# Altium PCB PCB1.PcbDoc
Units mm, origin at the board's own origin, x right, y up, seen from the top; angles counter-clockwise.
Board outline 32.22 x 32.95 mm, 4 copper layers (L1(SIGNAL), L2(GND), L3(GND), L4(SIGNAL)), stack 1.57 mm thick; 36 components, 28 nets, 174 pads, 87 vias.
Unrouted connection lines stored in the file: 1.
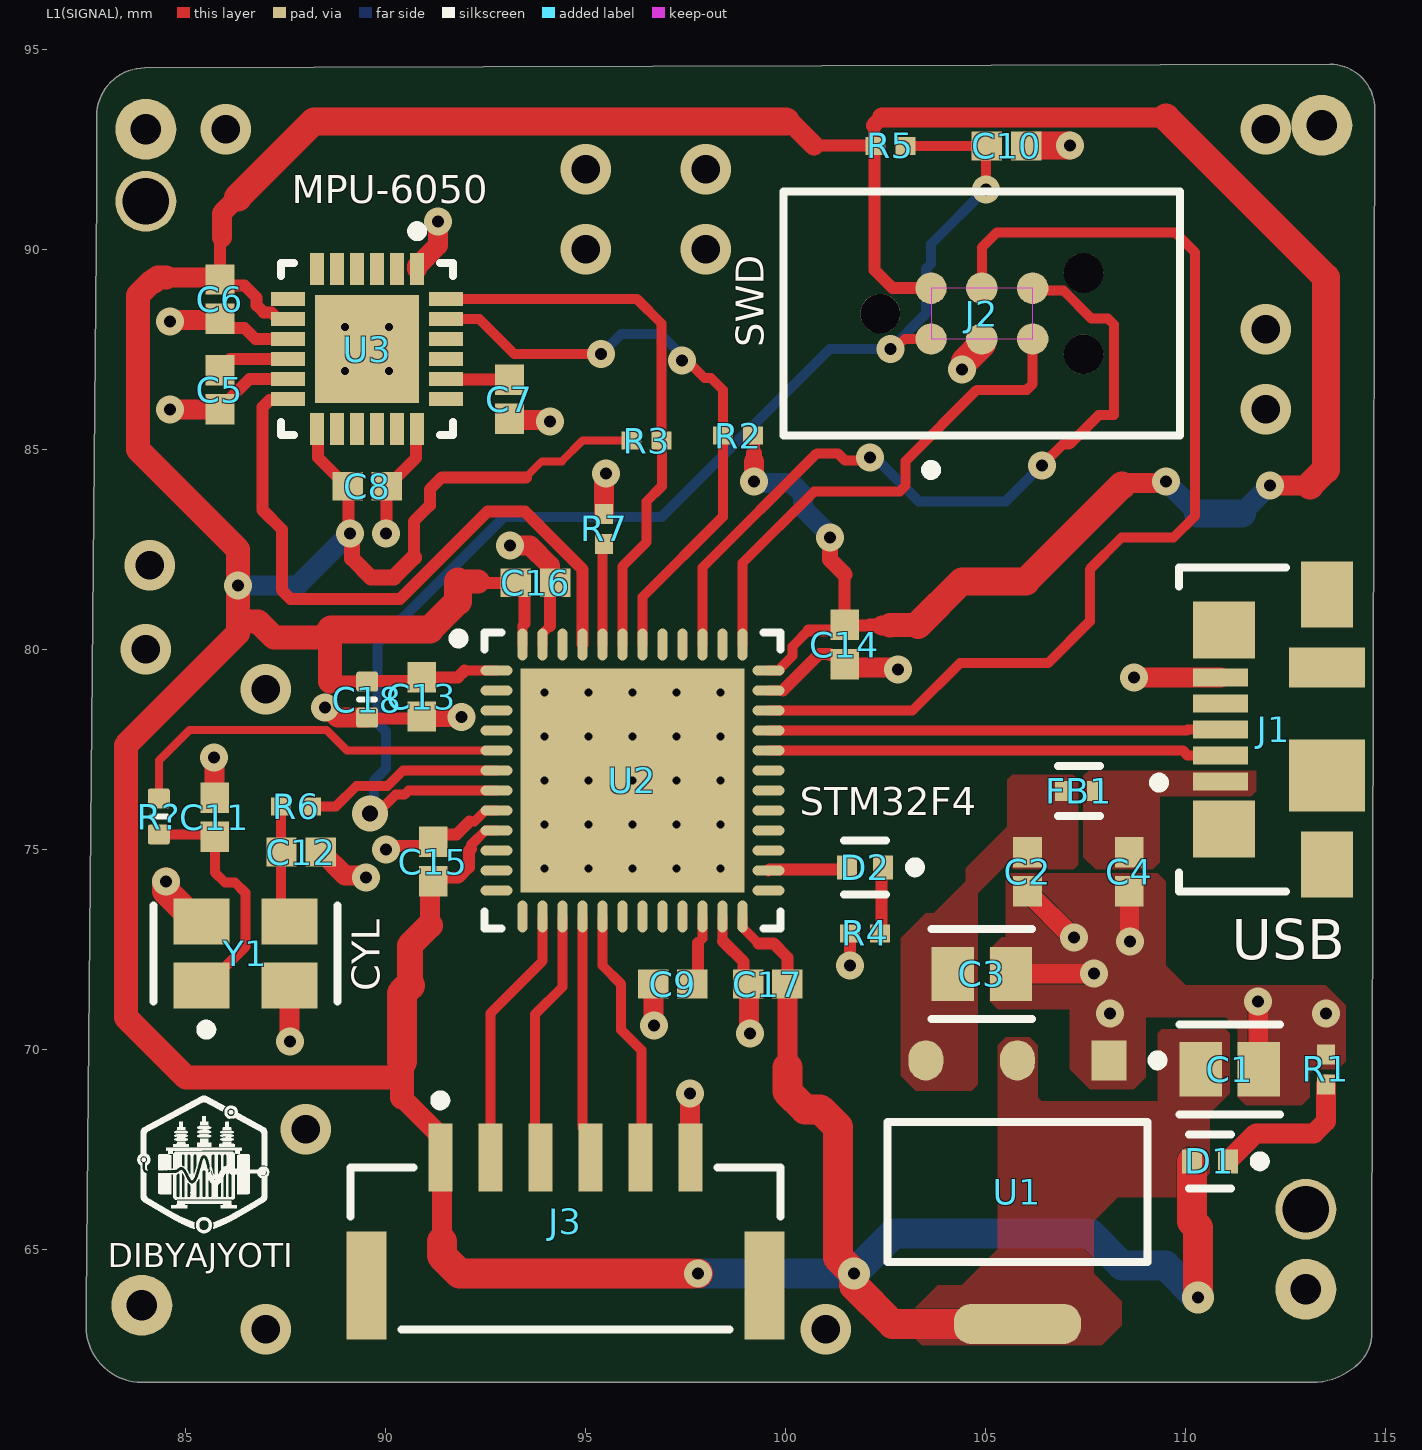
[diagram p0: L1(SIGNAL) view]
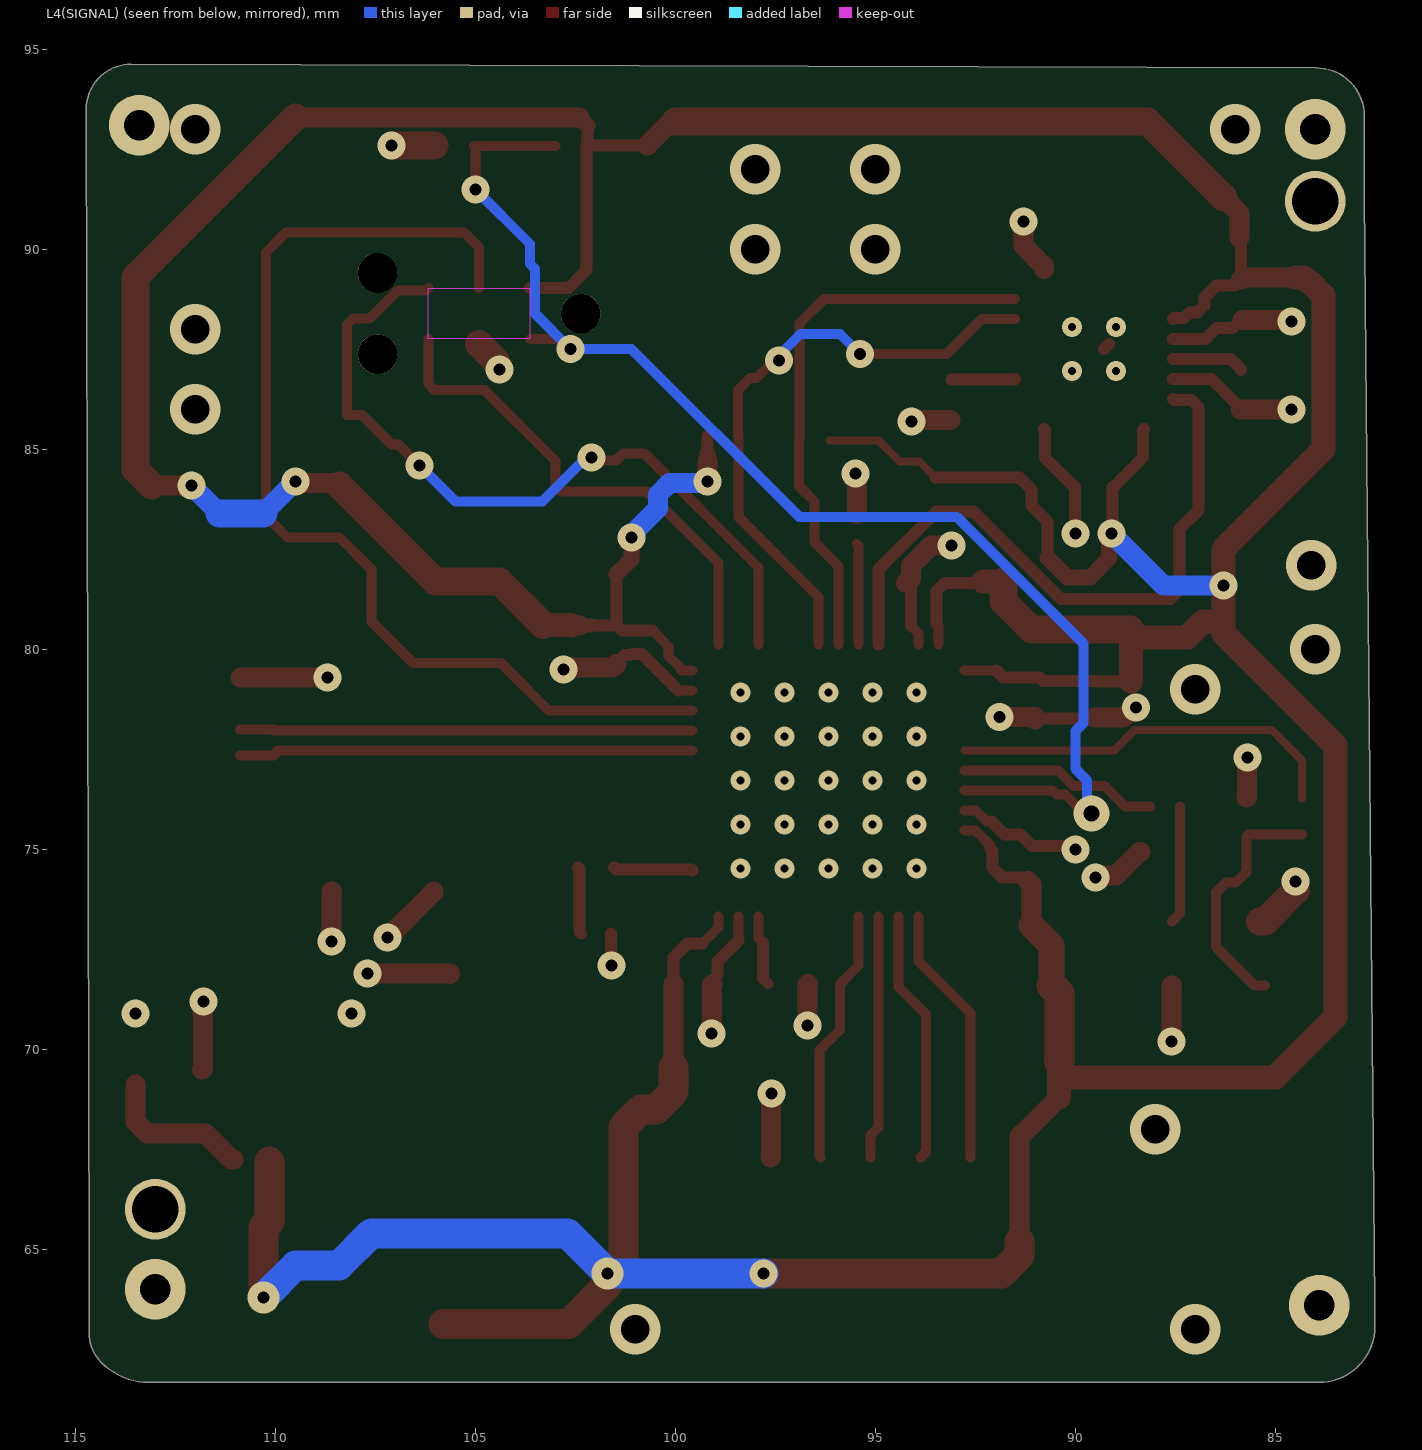
[diagram p1: L4(SIGNAL) view, seen from below]
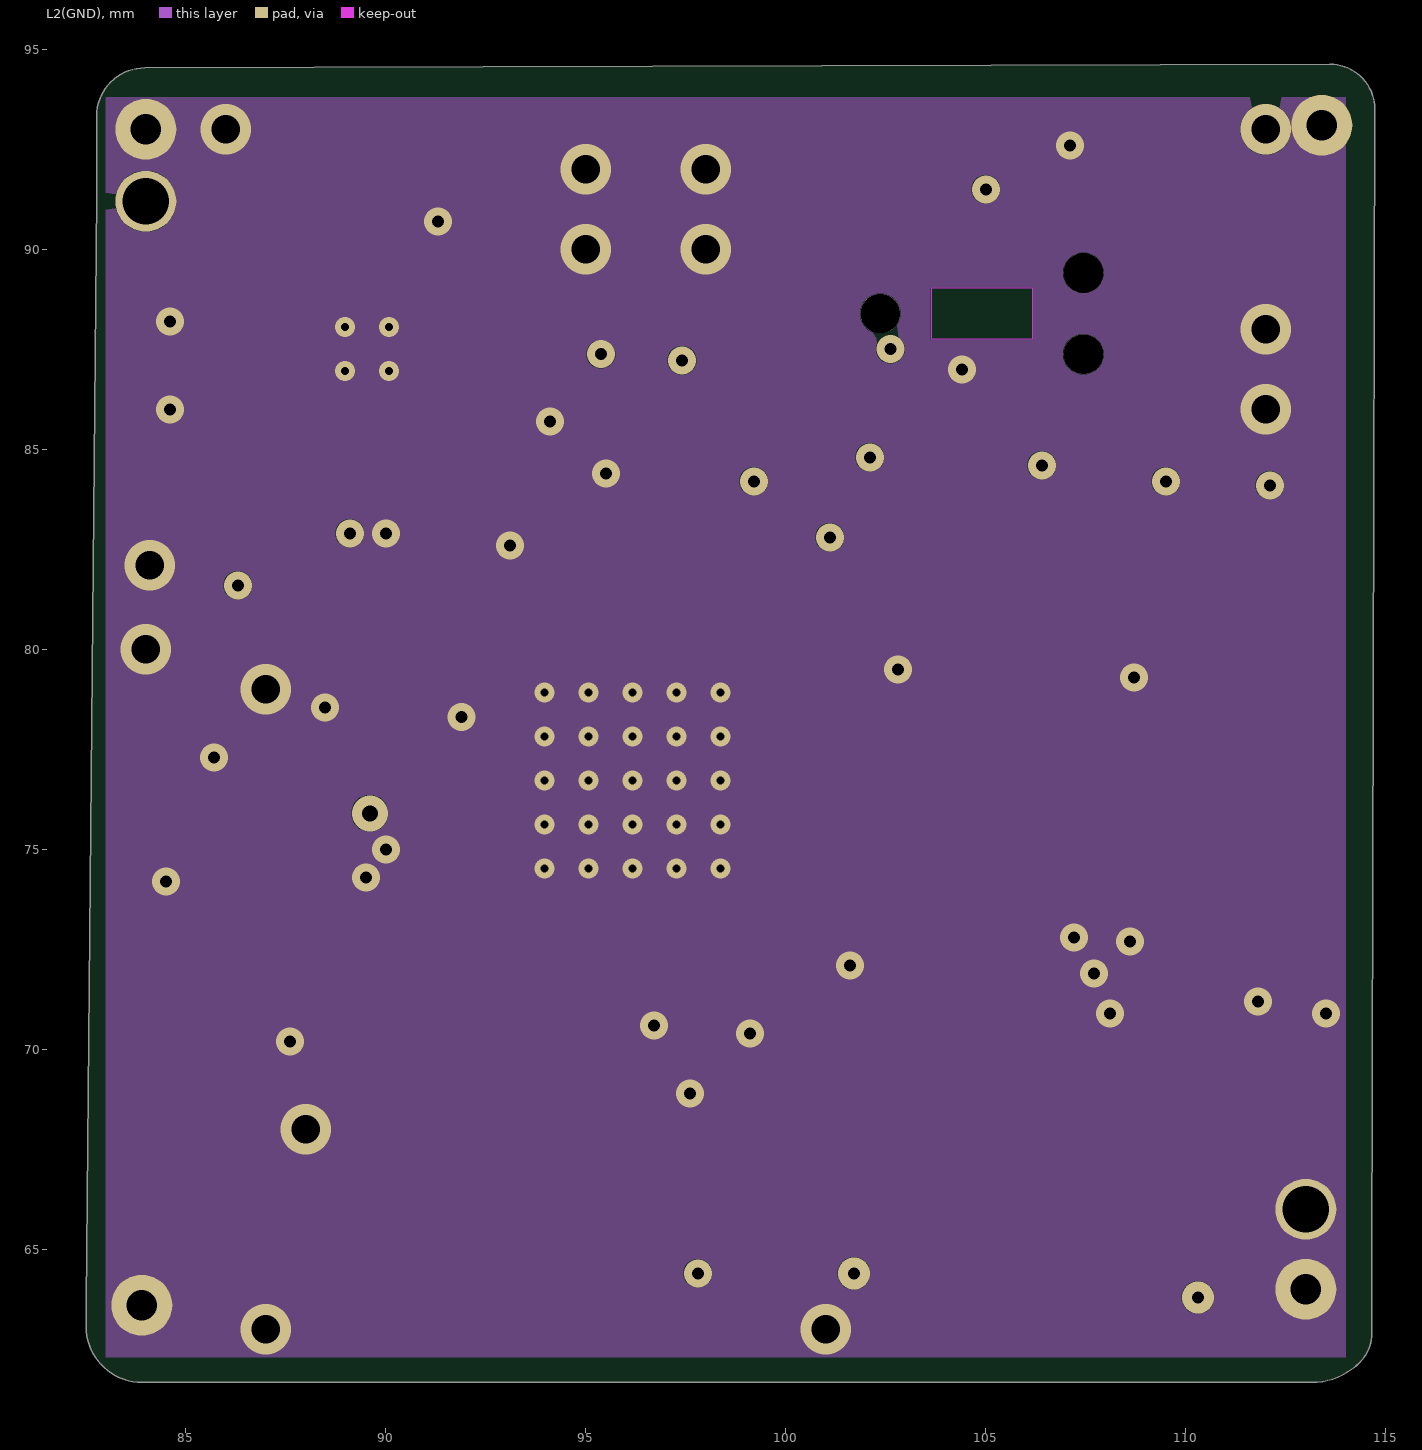
[diagram p2: L2(GND)]
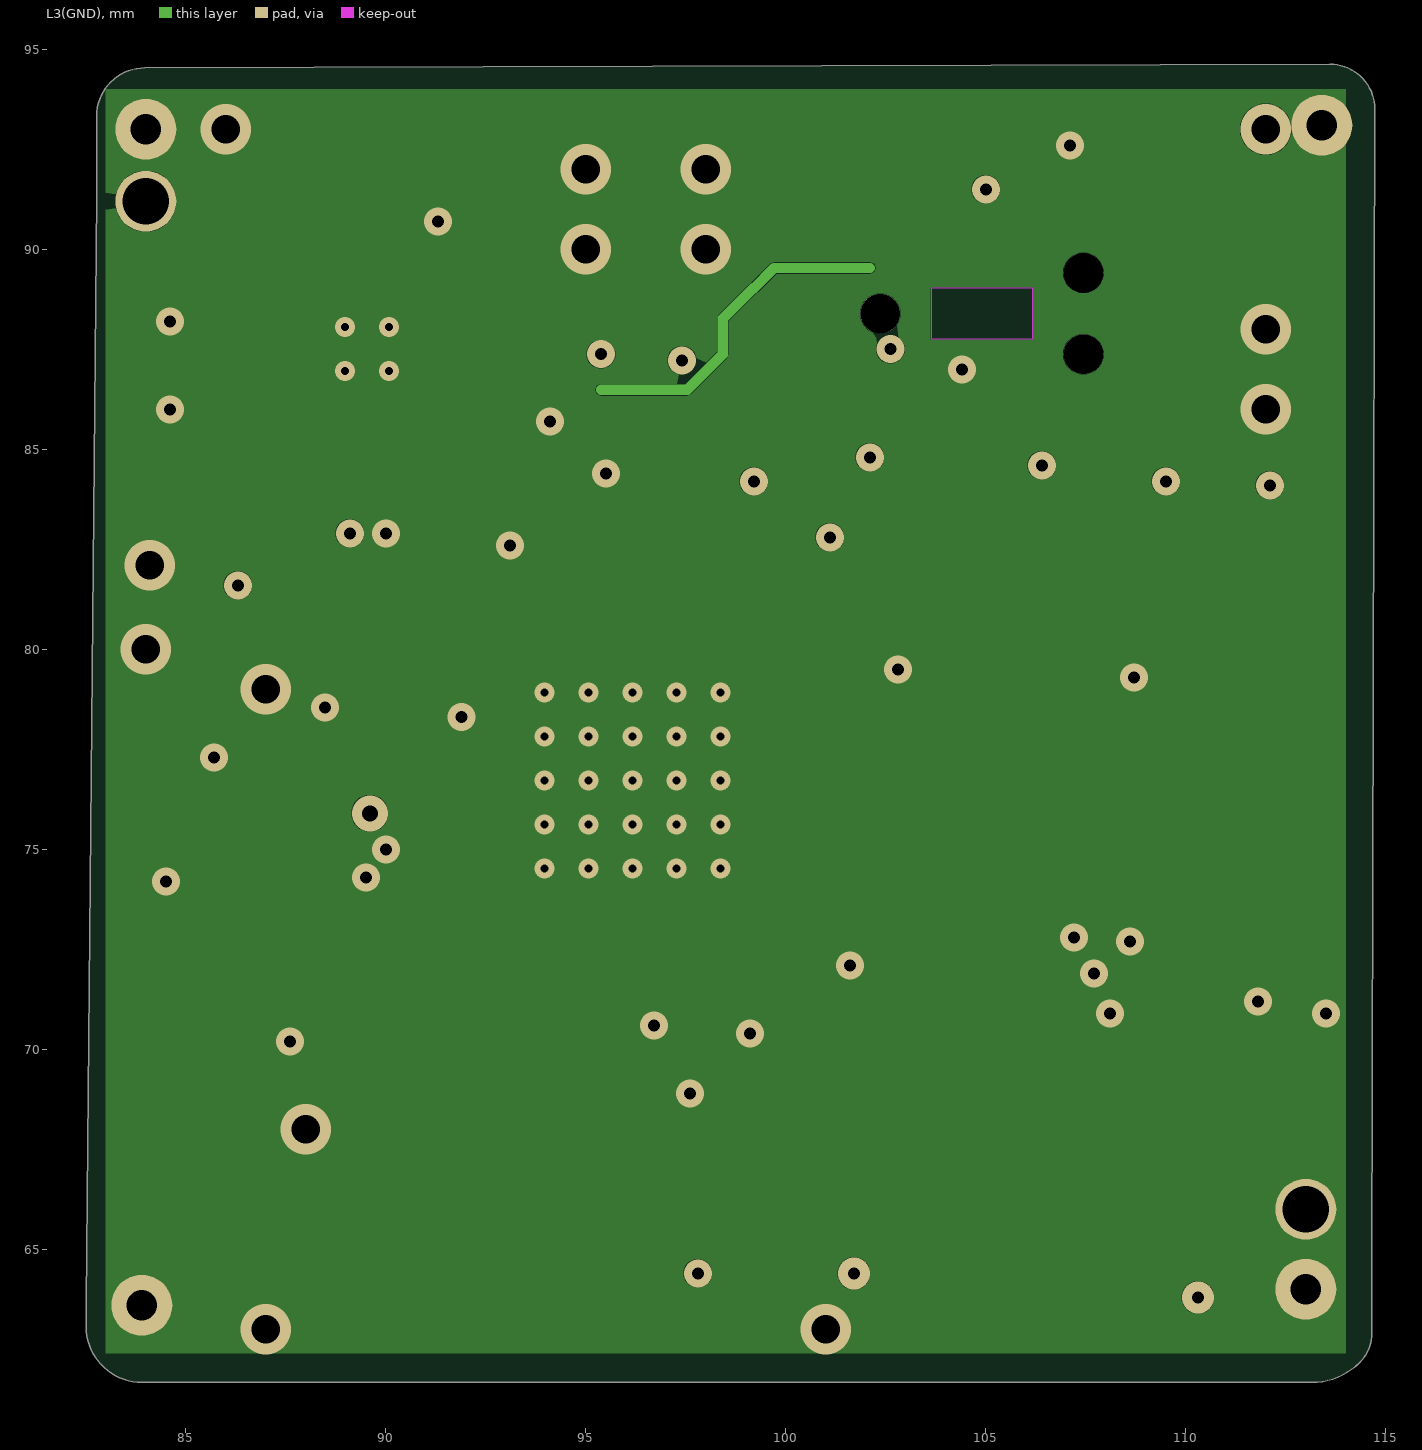
[diagram p3: L3(GND)]

## Layer stack, top to bottom
Top Solder: solder mask 0.0254, SM-001, Dk 4
L1(SIGNAL): signal copper 0.035
Dielectric 1: prepreg 0.2, PP-017, Dk 4.6
L2(GND): signal copper 0.0175
Dielectric 3: core 1.065, Core-039, Dk 4.6
L3(GND): signal copper 0.0175
Dielectric 5: prepreg 0.2, PP-017, Dk 4.6
L4(SIGNAL): signal copper 0.035
Bottom Solder: solder mask 0.0254, SM-001, Dk 4

## Board outline
82.51,63.07 82.51,63.666 82.51,63.667 82.771,91.3 82.773,91.317 82.773,93.33 cw(c83.978,93.33) 83.977,94.535 113.6,94.627 cw(c113.6,93.5) 114.727,93.5 114.649,64.5 114.649,62.894 cw(c113.623,62.894) 114.349,62.169 cw(c113.151,63.366) 113.151,61.673 112.8,61.673 85.2,61.673 83.907,61.673 cw(c83.907,63.07)

## Design rules (kind name [scope] priority, off if disabled: settings)
Clearance [All] p1: gap=0.005 ignorepadtopadclearanceinfootprint=FALSE
DiffPairsRouting [All] p1: maxlimit=0.254 minlimit=0.203 mostfreqgap=0.254 toplayer_maxgap=0.203 toplayer_prefgap=0.203 toplayer_minwidth=0.26 toplayer_maxwidth=0.26 toplayer_prefwidth=0.26 bottomlayer_maxgap=0.203 bottomlayer_prefgap=0.203 bottomlayer_minwidth=0.26 bottomlayer_maxwidth=0.26 bottomlayer_prefwidth=0.26 impedanceprofiledriven=TRUE impedanceprofileid={06808E62-EBBD-491B-83CC-CD129CA47F08} impedanceprofilevalue=90.000000 maxuncoupledlength=12.7
PolygonConnect [All] p1: connectstyle=Direct reliefconductorwidth=0.254 reliefentries=4 polygonreliefangle="90 Angle" airgapwidth=0.254
RoutingVias [All] p1: holewidth=0.3 width=0.7 viastyle="Through Hole" minholewidth=0.25 minwidth=0.55 maxholewidth=0.4 maxwidth=0.9
SolderMaskExpansion [All] p1: expansion=0 istentingtop=FALSE
SupplyNets "Schematic Supply Nets_4" [InNet('VBUS')] p1: voltage=0.000
SupplyNets "Schematic Supply Nets_3" [InNet('+3V3')] p2: voltage=0.000
SupplyNets "Schematic Supply Nets_2" [InNet('GND')] p3: voltage=0.000
SupplyNets "Schematic Supply Nets" [InNet('+5V')] p4: voltage=0.000
UnRoutedNet [All] p1: checkbadconnections=TRUE
Width [All] p1: maxlimit=1 minlimit=0.2 preferedwidth=0.3 midlayer1_minwidth=0.254 midlayer1_maxwidth=0.254 midlayer1_prefwidth=0.254 midlayer2_minwidth=0.254 midlayer2_maxwidth=0.254 midlayer2_prefwidth=0.254 minimp=50.000000 maximp=50.000000 favimp=50.000000
28 further rules are at their usual default settings.

## Classes and differential pairs
net class DIFF_USB: USB_D_N USB_D_P
differential pair USB_D: +USB_D_P -USB_D_N

## Components (designator, comment, footprint, x,y, rotation, side; value= is the part's Value field where it differs from the comment)
C1 "22u" FP-CL21-IPC_C 111.1,69.5 r0 top
C2 "100n" CAPC1050X55X23ML05T13 106.045,74.44 r90 top
C3 "22u" FP-CL21-IPC_C 104.902,71.882 r0 top
C4 "100n" CAPC1050X55X23ML05T13 108.585,74.44 r90 top
C5 "100n" CAPC1050X55X23ML05T13 85.852,86.487 r90 top
C6 "10n" CAPC1050X55X23ML05T13 85.852,88.755 r270 top
C7 "2n2" CAPC1050X55X23ML05T13 93.091,86.251 r270 top
C8 "100n" CAPC1050X55X23ML05T13 89.535,84.074 r180 top
C9 "2.2u" CAPC1050X55X23ML05T13 97.173,71.628 r0 top
C10 "100n" CAPC1050X55X23ML05T13 105.519,92.583 r180 top
C11 "100n" CAPC1050X55X23ML05T13 85.725,75.801 r270 top
C12 "100n" CAPC1050X55X23ML05T13 87.884,74.93 r180 top
C13 "100n" CAPC1050X55X23ML05T13 90.9,78.81 r90 top
C14 "100n" CAPC1050X55X23ML05T13 101.473,80.119 r90 top
C15 "100n" CAPC1050X55X23ML05T13 91.186,74.694 r270 top
C16 "100n" CAPC1050X55X23ML05T13 93.744,81.661 r180 top
C17 "100n" CAPC1050X55X23ML05T13 99.55,71.628 r0 top
C18 "Capacitor 2,2µF +/-20% 10V 0402" CAPC0402(1005)60_L 89.535,78.74 r90 top value=2.2µF
D1 "ML-P11DTT86R" FP-SML-P11-MFG 110.6,67.2 r180 top
D2 "ML-P11DTT86R" FP-SML-P11-MFG 101.981,74.549 r180 top
FB1 "120R" FP-BLM15-0_05-MFG 107.334,76.454 r180 top
J1 "473460001" FP-473460001-MFG 113.181,77.993 r90 top
J2 "TC2030-MCP-NL" FP-TC2030-MCP-NL-MFG 104.902,88.392 r0 top locked
J3 "SM06B-GHS-TB(LF)(SN)" FP-SM06B-GHS-TB_LF_SN-MFG 94.488,65.024 r0 top
R1 "1k" RESC1005X40X25LL05T10 113.5,69.5 r270 top
R2 "2K2" RESC1005X40X25LL05T10 98.806,85.344 r0 top
R3 "262" RESC1005X40X25LL05T10 96.52,85.217 r180 top
R4 "10K" RESC1005X40X25LL05T10 101.981,72.898 r0 top
R5 "10K" RESC1005X40X25LL05T10 102.616,92.583 r180 top
R6 "10K" RESC1005X40X25LL05T10 87.757,76.073 r180 top
R7 "10K" RESC1005X40X25LL05T10 95.459,83.007 r270 top
R? "Resistor 1K +/-5 % 0402 63 mW" RESC0402(1005)_L 84.328,75.819 r90 top value=1k
U1 "ams1117" FP-ams1117-IPC_C 105.791,66.428 r270 top
U2 "STM32F411CEU6" STM-UFQFPN48_L 96.168,76.72 r0 top
U3 "MPU-6050" IS-QFN-24_V 89.535,87.503 r270 top
Y1 "24MHz" FP-TSX-3225-MFG 86.487,72.39 r0 top

## Footprints (in the part's own frame and the unit in brackets; to place one, negate y for a bottom-side part, rotate by r counter-clockwise, add the part's x,y. Pads: shape width x height; smd on the part's side, far side on the other; paste and mask are expansions set on the pad)
CAPC0402(1005)60_L [mm] "Chip Capacitor, Body 1.0x0.5mm, Height 0.6mm, IPC High Density"
  rrect25% 0.5x0.55 smd: 1(-0.45,0) 2(0.45,0)
  silkscreen extent 0,-0.2 0,0.2, body extent -0.5,-0.25 0.5,0.25, height 0.6
CAPC1050X55X23ML05T13 [mm] "Chip Capacitor, 2-Leads, Body 1.05x0.55mm, IPC Low Density"
  rect 0.76x0.72 smd: 1(-0.49,0) 2(0.49,0)
  body extent -0.53,-0.28 0.53,0.27, height 0.55
FP-473460001-MFG [mm]
  rect 0.45x1.38 smd paste+0 mask+0: 1(-1.3,2.31) 2(-0.65,2.31) 3(0,2.31) 4(0.65,2.31) 5(1.3,2.31)
  rect 1.425x1.55 smd paste+0 mask+0: 6(-2.488,2.225) 7(2.488,2.225)
  rect 1.65x1.3 smd paste+0 mask+0: 8(-3.375,-0.35) 11(3.375,-0.35)
  rect 1.8x1.9 smd paste+0 mask+0: 9(-1.15,-0.35)
  rect 1x1.9 smd paste+0 mask+0: 10(1.55,-0.35)
  silkscreen extent -4.05,0.67 4.05,3.97, body extent -4.3,-2.48 4.3,3.45, height 0.25
FP-ams1117-IPC_C [mm]
  rect 1.004x0.872 smd paste+0 mask+0: 1(-3.295,2.29)
  rrect100% 1.004x0.872 smd paste+0 mask+0: 2(-3.295,0) 3(-3.295,-2.29)
  rrect87% 1.004x3.182 smd paste+0 mask+0: 4(3.295,0)
  silkscreen extent -3.42,-3.25 1.75,3.63, body extent -3.9,-3.35 3.9,3.35, height 0.25
FP-BLM15-0_05-MFG [mm]
  rect 0.4x0.5 smd paste+0 mask+0: 1(-0.4,0) 2(0.4,0)
  silkscreen extent -0.53,-0.63 0.52,0.63, body extent -0.7,-0.38 0.7,0.38, height 0.25
FP-CL21-IPC_C [mm]
  rect 1.055x1.356 smd paste+0 mask+0: 1(-0.726,0) 2(0.726,0)
  silkscreen extent -1.25,-1.12 1.25,1.12, body extent -1.35,-0.82 1.35,0.82, height 0.25
FP-SM06B-GHS-TB_LF_SN-MFG [mm]
  rect 0.6x1.7 smd paste+0 mask+0: 1(-3.125,2.275) 2(-1.875,2.275) 3(-0.625,2.275) 4(0.625,2.275) 5(1.875,2.275) 6(3.125,2.275)
  rect 1x2.7 smd paste+0 mask+0: 7(-4.975,-0.925) 8(4.975,-0.925)
  silkscreen extent -5.38,-2.02 5.38,3.82, body extent -5.58,-2.37 5.58,3.22, height 0.25
FP-SML-P11-MFG [mm]
  rect 0.5x0.6 smd paste+0 mask+0: 1(-0.45,0) 2(0.45,0)
  silkscreen extent -1.38,-0.67 0.53,0.67, body extent -0.8,-0.43 0.8,0.43, height 0.25
FP-TC2030-MCP-NL-MFG [mil]
  round 30.98 smd paste-39370.1 mask+0: 1(-50,-25) 2(-50,25) 3(0,-25) 4(0,25) 5(50,-25) 6(50,25)
  round 39.02 hole 39.02 unplated paste-99999 mask+0: ""(-100,0) ""(100,-40) ""(100,40)
  Keep-Out Layer region: -50,-25 50,-25 50,25 -50,25
  silkscreen extent -195,-159 195,120, body extent -199,-124 199,124, height 10
FP-TSX-3225-MFG [mm]
  rect 1.4x1.15 smd paste+0 mask+0: 1(-1.1,-0.8) 2(1.1,-0.8) 3(1.1,0.8) 4(-1.1,0.8)
  silkscreen extent -2.3,-2.02 2.3,1.2, body extent -1.9,-1.48 1.9,1.48, height 0.25
IS-QFN-24_V [mm] "QFN, 24-Leads, Body 4x4mm, Pitch 0.5mm, Thermal Pad 2.7x2.6mm"
  rect 0.8x0.35 smd: 1(-2,1.25) 2(-2,0.75) 3(-2,0.25) 4(-2,-0.25) 5(-2,-0.75) 6(-2,-1.25) 13(2,-1.25) 14(2,-0.75) 15(2,-0.25) 16(2,0.25) 17(2,0.75) 18(2,1.25)
  rect 0.35x0.85 smd mask+0.102: 7(-1.25,-1.975) 8(-0.75,-1.975) 9(-0.25,-1.975) 10(0.25,-1.975) 11(0.75,-1.975) 12(1.25,-1.975) 19(1.25,1.975) 20(0.75,1.975) 21(0.25,1.975) 22(-0.25,1.975) 23(-0.75,1.975) 24(-1.25,1.975)
  rect 2.7x2.6 smd: 25(0,0)
  silkscreen extent -3.07,-2.15 2.15,2.15, body extent -2,-2 2,2, height 0.95
RESC0402(1005)_L [mm] "Chip Resistor, Body 1.0x0.5mm, IPC High Density"
  rrect25% 0.5x0.55 smd: 1(-0.45,0) 2(0.45,0)
  silkscreen extent 0,-0.2 0,0.2, body extent -0.5,-0.25 0.5,0.25, height 0.3
RESC1005X40X25LL05T10 [mm] "Chip Resistor, 2-Leads, Body 1.00x0.50mm, IPC High Density"
  rect 0.5x0.45 smd: 1(-0.375,0) 2(0.375,0)
  body extent -0.53,-0.27 0.53,0.28, height 0.4
STM-UFQFPN48_L [mm] "QFN, 48-Leads, Body 7.1x7.1mm, Pitch 0.5mm, Thermal Pad 5.6x5.6mm, IPC High Density"
  oval 0.8x0.25 smd: 1(-3.4,2.75) 2(-3.4,2.25) 3(-3.4,1.75) 4(-3.4,1.25) 5(-3.4,0.75) 6(-3.4,0.25) 7(-3.4,-0.25) 8(-3.4,-0.75) 9(-3.4,-1.25) 10(-3.4,-1.75) 11(-3.4,-2.25) 12(-3.4,-2.75) 25(3.4,-2.75) 26(3.4,-2.25) 27(3.4,-1.75) 28(3.4,-1.25) 29(3.4,-0.75) 30(3.4,-0.25) 31(3.4,0.25) 32(3.4,0.75) 33(3.4,1.25) 34(3.4,1.75) 35(3.4,2.25) 36(3.4,2.75)
  oval 0.25x0.8 smd: 13(-2.75,-3.4) 14(-2.25,-3.4) 15(-1.75,-3.4) 16(-1.25,-3.4) 17(-0.75,-3.4) 18(-0.25,-3.4) 19(0.25,-3.4) 20(0.75,-3.4) 21(1.25,-3.4) 22(1.75,-3.4) 23(2.25,-3.4) 24(2.75,-3.4) 37(2.75,3.4) 38(2.25,3.4) 39(1.75,3.4) 40(1.25,3.4) 41(0.75,3.4) 42(0.25,3.4) 43(-0.25,3.4) 44(-0.75,3.4) 45(-1.25,3.4) 46(-1.75,3.4) 47(-2.25,3.4) 48(-2.75,3.4)
  rect 5.6x5.6 smd: 49(0,0)
  silkscreen extent -4.47,-3.7 3.7,3.7, body extent -3.55,-3.55 3.55,3.55, height 0.6

## Part data
C1 C3: library part CMP-2000-05017-2, "CL21 Series 0805 100nF 50V ±10% Tolerance X7R Multilayer Ceramic Chip Capacitor", Capacitance=100nF, Case Code (Imperial)=0805, Case Code (Metric)=2012, Dielectric=X7R, Max Operating Temperature=125°C, Min Operating Temperature=-55°C, Tolerance=10%, Voltage=50V, Case/Package=0805, Contact Plating=Tin, Depth=1.25mm, Height=0.85mm, Lead Free="Lead Free", Length=2mm, Material=Ceramic, Mount="Surface Mount", Packaging="Tape and Reel", Radiation Hardening=No, Thickness=0.037inch, Voltage Rating=50V, Voltage Rating (DC)=50V, Width=0.049inch
C2 C4 C5 C6 C7 C8 C9 C10 C11 C12 C13 C14 C15 C16 C17: library part CMP-2000-05439-1, "Chip Capacitor, 100 nF, +/- 10%, 16 V, -55 to 125 degC, 0402 (1005 Metric), RoHS, Tape and Reel", Capacitance=100000pF, Case Size/Dimension=0402, Dielectric=X7R, Manufacturer="Samsung Electro-Mechanics", Rated Voltage=16V, Tolerance (%)=±10%, Datasheet URL=https://datasheet.ciiva.com/29198/458718-da-01-en-vs-kondensator-0402-29198423.pdf, Datasheet Version=Nov-10, Manufacturer URL=http://www.samsungsem.com/global/index.jsp
C18: library part CMP-001-00056-4, "Chip Capacitor, 2,2µF +/-20%, 10V, 0402, Thickness 0.6 mm", Case/Package=0402, Max Operating Temperature=85°C, Min Operating Temperature=-55°C, Tolerance=10%, Voltage Rating=10V, Mounting Technology=SMT, Pins=2
D1 D2: library part CMP-08952-000022-1, "LED ORANGE CLEAR 1006 SMD", Colour=Orange, Forward Current=1mA, Forward Voltage=1.9V, Manufacturer=Rohm, Manufacturer Part Number=SML-P11DTT86R, Package=SML-P11, Power Dissipation=52mW, Reverse Voltage=5V, Temperature="-40°C to +85°C", Temperature Range High=+85°C, Temperature Range Low=-40°C, Automotive=No, Category=Diode, ComponentLink2Description=Datasheet, ComponentLink2URL=https://d1d2qsbl8m0m72.cloudfront.net/en/products/databook/datasheet/opto/led/chip_mono/sml-p11-e.pdf, Device Class L1=Optoelectronics, Device Class L2=LEDs, Device Class L3=unset, Digikey Description="LED ORANGE CLEAR 1006 SMD", Height=0.25mm, Lead Free=Yes, Led Orientation="Top View", Luminous Intensity=7.3mcd, Mouser Description="LED Uni-Color Orange 2-Pin Chip 0402(1006Metric) T/R", Octopart=https://octopart.com/sml-p11dtt86r-rohm-34112313, RoHS=TRUE, Wavelength=605nm
FB1: library part CMP-0686-00187-4, "Chip Ferrite Bead, 0402, 600Ω @ 100MHz, 0.52Ω, 25%, 300mA", Case Code (Imperial)=0402, Case Code (Metric)=1005, Current Rating=300mA, DC Resistance (DCR)=520mR, DC Resistance-Max=600mR, Frequency=100MHz, Max Operating Temperature=125°C, Min Operating Temperature=-55°C, Package Quantity=10000, Tolerance=25%, Case/Package=0402, Core Material=Ferrite, DC Current=300mA, Depth=0.55mm, Height=0.5mm, Impedance=600R, Lead Free="Lead Free", Length=1mm, Material=Steel, Max Current Rating=300mA, Max DC Current=300mA, Military Standard=Not, Number of Circuits=1, Number of Lines=1, Number of Pins=2, Packaging="Tape and Reel", Radiation Hardening=No, REACH SVHC="No SVHC", RoHS Compliant=Yes, Series=BLM15AG_SN, Shielding=Unshielded, Termination=SMD/SMT, Test Frequency=100MHz, Width=0.5mm
J1: library part CMP-2000-05246-2, "CONN RCPT USB2.0 MICRO B SMD R/A", Current Rating=1.8A, Manufacturer=Molex, Package=0, Temperature="-30°C to +85°C", Temperature Range High=+85°C, Temperature Range Low=-30°C, Voltage Rating=30V, Automotive=No, Category=Conn, ComponentLink2Description=Datasheet, ComponentLink2URL=https://www.molex.com/webdocs/datasheets/pdf/en-us/0473460001_IO_CONNECTORS.pdf, Conn Orientation="Right Angle", Contact Material=Gold,Nickel, Device Class L1=Connectors, Device Class L2="USB Connectors", Device Class L3=unset, Digikey Description="CONN RCPT USB2.0 MICRO B SMD R/A", Footprint Url=https://www.molex.com/pdm_docs/sd/473460001_sd.pdf, Height=2.945mm, Is Female=yes, Lead Free=Yes, Manufacturer Part Number=473460001, Number Of Contacts=5, Octopart=https://octopart.com/47346-0001-molex-7164928, Pitch=0.65mm, RoHS=TRUE, Shielding=true, Usb Standard="USB 2.0"
J2: library part CMP-205963-000002-1, "CABLE TAG-CONNECT IN-CIRCUIT", Package Quantity=1, Lead Free="Lead Free", Reach SVHC Compliant=Yes, RoHS Compliant=Yes, Series=-
J3: library part CMP-17439-000061-1, "CONN HEADER SMD R/A 6POS 1.25MM", Color=Natural, Contact Resistance=50mR, Current Rating=1A, Housing Color=Beige, Max Operating Temperature=85°C, Max Voltage Rating (AC)=50V, Min Operating Temperature=-25°C, Connector Type="Outer Shroud Contact", Contact Material=Bronze, Contact Plating=Tin, Depth=4.05mm, Fastening Type=Ramp, Housing Material=Polyamide, Lead Free="Lead Free", Length=10.75mm, Max Current Rating=1A, Mount="Surface Mount", Number Of Contacts=6, Number of Positions=6, Number of Rows=1, Orientation="Right Angle", Packaging="Tape and Reel", Pitch=1.25mm, Termination=Solder, Voltage Rating=50V
R1 R2 R3 R4 R5 R6 R7: library part CMP-2002-07353-1, Manufacturer="Yageo / Phycomp", Part Number=RC0402FR-0710KL
R?: library part CMP-009-00157-3, "Chip Resistor, 1 kOhms, +/-5 %, 63 mW, -55 to 155 degC, 0402", Case/Package=0402, Max Operating Temperature=155°C, Min Operating Temperature=-55°C, Power=63mW, Tolerance=5%, Pins=2
U1: library part CMP-209535-000002-1, "1A LOW DROPOUT VOLTAGE REGULATOR", RoHS Compliant=Yes
U2: library part CMP-0243-00165-1, "ARM Cortex-M4 32-bit MCU+FPU, 512 KB Flash, 128 KB RAM, 36 I/Os, 48-Pin UFQFPN, -40 to 85 degC, Tray", I/Os (High Current)=36, Operating Frequency(F) (Processor speed) (MHz)=100, Package Description=UFQFPN48, Package Reference="48-Pin Ultra Thin Fine Pitch Quad Flat No-Lead, 7 x 7 x 0.6 mm Body, 0.5 mm Pitch, Exposed Pad", Supply Voltage(Vcc) min (V)=1.7, ComponentLink1Description="Manufacturer URL", ComponentLink1URL=http://www.st.com/, ComponentLink2Description=Datasheet, ComponentLink2URL=http://www.st.com/st-web-ui/static/active/en/resource/technical/document/datasheet/DM00115249.pdf, Core="ARM Cortex-M4", DatasheetVersion="Rev. 6", FLASH Size (Prog) (kB)=512, Internal RAM Size (kB)=128, Mounting Technology="Surface Mount", Packing=Tray
U3: library part CMP-1753-00002-2, "3-Axis Gyroscope, Accelerometer and a Digital Motion Processor(TM) (DMP), 2.375 to 3.46 V, -40 to 85 degC, 24-Pin QFN, RoHS, Tape and Reel", Manufacturer=InvenSense, Standard Package=5,000, Category=Sensors,Transducers, Datasheet URL=http://datasheet.octopart.com/MPU-6050-InvenSense-datasheet-14421344.pdf, Datasheet Version="Rev. 3.3, 05/2012", Dynamic Catalog=MPU-6000™Series, Family=Multifunction, Featured Product=MPU-60506-Axis,IntegratedI²CSolution, Manufacturer URL=http://www.invensense.com/, Online Catalog=MPU-6000™Series, Other Names="1428-1007-2 / MPU6050", Output Type=Digital, Sensor Type=MotionTracking, Unit PriceUSD=Digital
Y1: library part CMP-36405-000018-1, "CRYSTAL 24.0000MHZ 9PF SMD", Case/Package=SMD/SMT, ESR (Equivalent Series Resistance)=40R, Frequency Stability=20ppm, Frequency Tolerance=10ppm, Load Capacitance=9pF, Max Operating Temperature=105°C, Min Operating Temperature=-40°C, Package Quantity=250, Depth=2.5mm, Drive Level=200uW, Frequency=24MHz, Height=0.024inch, Lead Free="Lead Free", Length=3.2mm, Mount="Surface Mount", Number of Pins=4, Packaging="Tape and Reel", RoHS Compliant=Yes, Series=TSX-3225, Termination=SMD/SMT, Tolerance=10ppm, Weight=0.000564oz, Width=2.5mm

## Free pads (board coordinates)
  round 1.524 hole 0.762: 7(113.4,93.1) 8(113,64) 9(83.9,63.6) 10(84,93)
  round 1.524 hole 1.152: TH(84,91.2) TH(113,66)

## Via types
v1: diameter 0.7, hole 0.3, L1(SIGNAL) to L4(SIGNAL), 41 vias
v2: diameter 0.5, hole 0.2, L1(SIGNAL) to L4(SIGNAL), 29 vias
v3: diameter 1.27, hole 0.711, L1(SIGNAL) to L4(SIGNAL), 14 vias
v4: diameter 0.8, hole 0.3, L1(SIGNAL) to L4(SIGNAL), 2 vias
v5: diameter 0.9, hole 0.4, L1(SIGNAL) to L4(SIGNAL), 1 vias

## Nets (pads, with @x,y where several pads share a name; then routed paths per layer and width w, separated by ;. In a path a pad name is that pad's centre, name@x,y a point inside that pad or via, vN(x,y) a via of type N, cw(c..) or ccw(c..) an arc to the next point about the centre after c; other vN are vias at no path point)
IMU_CPOUT: C7.1 U3.20 | length 1.6
  L1(SIGNAL) w0.3: U3.20 91.516,86.747 93.085,86.747 C7.1
+3V3: C1.1 C6.1 C8.2 C13.2 C14.2 C15.2 C16.2 C17.2 C18.2 D1.2 J2.2 J3.1 R2.2 R3.2 R5.2 U1.2 U1.4 U2.1 U2.9 U2.24 U2.36 U2.48 U3.8 U3.13 | length 189.1
  L1(SIGNAL) w0.2: 93.5,84.3 93.9,84.7 94.4,84.7 94.917,85.217 R3.2
  L1(SIGNAL) w0.25: 91.97,79.47 U2.1 ; 92.125,75.007 92.125,75.102 92.493,75.47 U2.9 ; U2.48 93.418,80.591 93.472,80.645 ; U2.24 98.918,73.045 99.319,72.644 ; U2.36 99.843,79.47 99.843,79.504 100.169,79.83 100.169,80.071 100.564,80.466
  L1(SIGNAL) w0.3: 85.9,90.3 85.852,90.252 C6.1 86.007,89.09 86.473,89.09 86.772,88.791 86.772,88.599 86.948,88.423 87.14,88.423 87.285,88.278 87.535,88.278 U3.8 ; U3.13 88.31,85.478 88.31,84.789 89.025,84.074 C8.2 89.072,84.046 89.072,82.927 v1(89.1,82.9) ; 88.61,79.19 C18.2 89.555,79.21 90.81,79.21 C13.2 91.8,79.3 91.97,79.47 ; 90.7,82.3 90.7,83.2 91.1,83.6 91.1,84 91.4,84.3 93.5,84.3 ; C15.2 91.277,74.295 91.821,74.295 92.075,74.549 92.075,74.958 92.125,75.007 ; 92.3,81.7 92.339,81.661 C16.2 ; C16.2@93.262,81.661 93.472,81.451 93.472,80.645 ; R2.2 99.2,85.325 99.2,84.9 ; 99.319,72.644 99.695,72.644 100.04,72.299 C17.2 ; 100.564,80.466 101.33,80.466 C14.2 ; 100.7,92.6 R5.2@102.224,92.6 ; 101.473,81.873 C14.2 ; 102.1,80.6 101.482,80.6 C14.2 ; 102.2,93.1 102.2,92.624 R5.2@102.224,92.6 ; J2.2 102.673,89.027 102.224,89.476 R5.2@102.224,92.6
  L1(SIGNAL) w0.35: 102.1,80.6 102.3,80.6
  L1(SIGNAL) w0.4: v1(89.1,82.9) 89.157,82.843 89.157,82.269 89.626,81.8 90.2,81.8 90.7,82.3 ; 99.2,84.7 99.2,84.9 ; v1(101.1,82.8) 101.1,82.246 101.473,81.873 ; 102.2,93.1 102.4,93.3 ; 102.3,80.6 102.4,80.6
  L1(SIGNAL) w0.5: 84.5,89.3 85.797,89.3 C6.1 ; 85.9,90.3 85.9,90.9 86.3,91.3 ; 90.401,68.799 91.301,67.899 91.313,67.899 91.4,67.812 91.4,65.2 ; 91.1,73.1 91.1,74.118 C15.2 ; v1(99.2,84.2) 99.2,84.7 ; 100,93.2 100.1,93.2 100.7,92.6 ; 100.04,69.54 C17.2 ; 102.4,80.6 102.6,80.6 ; 102.4,93.3 109.5,93.3 ; 108.4,84.1 108.462,84.162 109.462,84.162 v1(109.5,84.2) ; v1(112.1,84.1) 113.1,84.1
  L1(SIGNAL) w0.6: 84.5,89.3 84.3,89.3 84.2,89.2 84.151,89.2 83.8,88.849 83.8,85 86.3,82.5 v1(86.3,81.6) 86.3,80.7 ; 88.61,79.19 88.61,80.5 88.41,80.3 87.2,80.3 86.8,80.7 86.3,80.7 ; 90.401,68.799 90.401,69.3 ; 90.401,69.699 90.401,69.3 ; 91.8,81.7 92.3,81.7 ; 102.6,80.6 102.609,80.609 103.309,80.609 ; 86.3,80.7 86.3,80.4 83.5,77.6 83.5,70.8 85,69.3 90.401,69.3
  L1(SIGNAL) w0.65: 90.6,71.6 90.6,72.6 91.1,73.1
  L1(SIGNAL) w0.7: 86.3,91.3 88.2,93.2 99,93.2 100,93.2 ; 88.627,80.5 91.1,80.5 91.8,81.2 91.8,81.7 ; 103.309,80.609 104.4,81.7 106,81.7 108.4,84.1 ; 109.5,93.3 113.5,89.3 113.5,84.5 113.1,84.1
  L1(SIGNAL) w0.75: 90.4,69.7 90.4,71.4 90.6,71.6 ; 91.4,65.2 91.4,64.839 91.839,64.4 v1(97.8,64.4) ; 100.04,69.54 100.04,68.939 100.479,68.5 100.861,68.5 101.3,68.061 101.3,64.8 101.71,64.39 101.71,64.09 102.667,63.133 U1.4 ; D1.2 110.15,65.7 110.3,65.55 v4(110.3,63.8)
  L3(GND) w0.254: 95.377,86.487 97.536,86.487 98.425,87.376 98.425,88.265 99.187,89.027 99.205,89.027 99.713,89.535 102.108,89.535
  L4(SIGNAL) w0.5: v1(86.3,81.6) 87.8,81.6 v1(89.1,82.9) ; v1(99.2,84.2) 99.238,84.162 100.138,84.162 100.431,83.869 100.431,83.523 101.1,82.854 v1(101.1,82.8) ; v1(109.5,84.2) 110.3,83.4 ; 111.4,83.4 v1(112.1,84.1)
  L4(SIGNAL) w0.7: 110.3,83.4 111.4,83.4
  L4(SIGNAL) w0.75: v1(97.8,64.4) v4(101.7,64.4) 102.7,65.4 107.6,65.4 108.406,64.594 109.493,64.594 110.286,63.8 v4(110.3,63.8)
+5V: C2.2 C3.1 FB1.2 U1.3
GND: C1.2 C2.1 C3.2 C4.1 C5.1 C6.2 C7.2 C8.1 C9.1 C10.1 C11.1 C12.1 C13.1 C14.1 C15.1 C16.1 C17.1 C18.1 J1.5 J2.3 J3.6 pad.7 pad.8 pad.9 pad.10 pad.TH@113,66 R1.1 R4.1 R7.1 U1.1 U2.8 U2.23 U2.35 U2.47 U2.49 U3.1 U3.9 U3.11 U3.18 U3.25 Y1.2 Y1.4 | length 49.5
  L1(SIGNAL) w0.25: 92.09,75.692 92.215,75.692 92.493,75.97 U2.8 ; U2.47 93.918,80.395 94.107,80.584 ; U2.23 98.418,72.715 98.425,72.707 ; U2.35 U2.35@99.925,78.97
  L1(SIGNAL) w0.3: v1(84.6,86) v1@84.602,85.998 ; v1(84.6,88.2) v1@84.633,88.232 ; C6.2@85.819,88.232 C6.2 ; C5.1@85.851,85.998 C5.1 ; C5.1@85.852,86.017 86.588,86.753 U3.11 ; C6.2@85.852,88.245 86.062,88.035 86.463,88.035 86.615,87.883 86.745,87.753 U3.9 ; U3.25@89.154,87.63 U3.25@89.281,87.503 ; C18.1 89.555,78.27 91.01,78.27 C13.1@91.039,78.27 ; v1(90,75) 90.077,75.077 91.079,75.077 91.376,75.374 91.772,75.374 92.09,75.692 ; v1(90,82.9) 90.012,82.912 90.012,84.062 C8.1 ; C8.1@90.045,84.074 90.76,84.789 90.76,85.478 U3.18 ; C7.2 C7.2@93.122,85.73 ; v1@94.069,85.73 v1(94.1,85.7) ; 94.107,80.584 94.107,81.534 C16.1 ; v1@95.459,84.359 v1(95.5,84.4) ; 98.425,72.707 98.949,72.184 C17.1@98.949,71.882 ; U2.35@99.925,78.97 100.838,79.883 101.087,79.883 101.111,79.859 101.263,79.859 101.473,79.649 C14.1 ; v1(101.6,72.1) 101.603,72.103 101.603,72.895 R4.1 ; v1(104.4,87) 104.477,87.077 v1@104.477,87.2 ; J2.3@104.91,87.633 J2.3@104.91,87.757 ; C10.1 C10.1@106.017,92.591 ; v1@107.091,92.591 v1(107.1,92.6)
  L1(SIGNAL) w0.5: v1@84.602,85.998 C5.1@85.851,85.998 ; v1@84.633,88.232 C6.2@85.819,88.232 ; v1(85.7,77.3) 85.713,77.287 85.713,76.303 C11.1 ; Y1.2 87.594,71.583 87.594,70.206 v1(87.6,70.2) ; C12.1 88.394,74.93 88.986,74.338 89.462,74.338 v1(89.5,74.3) ; v1(88.485,78.547) 88.539,78.547 88.796,78.29 C18.1 ; U3.1 90.785,89.578 91.3,90.093 v1(91.3,90.7) ; C13.1@91.01,78.25 91.01,78.27 91.01,78.31 v1(91.89,78.31) ; v1(93.1,82.6) 93.6,82.6 94.104,82.096 94.104,81.771 94.214,81.661 C16.1 ; C7.2@93.122,85.73 v1@94.069,85.73 ; R7.1 v1@95.459,84.359 ; C9.1 96.692,71.619 96.692,70.608 v1(96.7,70.6) ; v1(97.6,68.9) 97.607,68.893 97.607,67.305 J3.6 ; C17.1 99.08,71.608 99.08,70.42 v1(99.1,70.4) ; C14.1 101.564,79.538 102.762,79.538 v1(102.8,79.5) ; C3.2 105.637,71.891 107.691,71.891 v1(107.7,71.9) ; C2.1 106.045,73.93 107.175,72.8 v1(107.2,72.8) ; v1@108.081,70.881 v1(108.1,70.9) ; C4.1 108.593,73.942 108.593,72.707 v1(108.6,72.7) ; v1(108.7,79.3) 108.704,79.296 110.868,79.296 J1.5 ; v1(111.8,71.2) 111.813,71.187 111.813,69.513 C1.2
  L1(SIGNAL) w0.7: v1(84.5,74.2) 84.5,73.952 85.262,73.19 Y1.4 ; v1@104.477,87.2 J2.3@104.91,87.633 ; C10.1@106.017,92.591 v1@107.091,92.591
  other v1: 113.5,70.9
  other v2: 93.968,74.52 95.068,74.52 96.168,74.52 97.268,74.52 98.368,74.52 93.968,75.62 95.068,75.62 96.168,75.62 97.268,75.62 98.368,75.62 93.968,76.72 95.068,76.72 96.168,76.72 97.268,76.72 98.368,76.72 93.968,77.82 95.068,77.82 96.168,77.82 97.268,77.82 98.368,77.82 93.968,78.92 95.068,78.92 96.168,78.92 97.268,78.92 98.368,78.92 88.985,86.953 90.085,86.953 88.985,88.053 90.085,88.053
  other v3: 87,63 101,63 88,68 87,79 84,80 84.1,82.1 112,86 112,88 95,90 98,90 95,92 98,92 86,93
"IMU _REGOUT": C5.2 U3.10 | length 1.8
  L1(SIGNAL) w0.3: C5.2 85.852,86.997 86.108,87.253 U3.10
IMU_INT: U2.45 U3.12 | length 16.5
  L1(SIGNAL) w0.3: U3.12 87.535,86.228 87.092,86.228 86.917,86.052 86.917,83.483 87.4,83 87.4,81.476 87.615,81.261 90.361,81.261 92.539,83.439 93.479,83.439 94.918,82 U2.45
IMU_SCL: R2.1 U2.42 U3.23 | length 15.3
  L1(SIGNAL) w0.25: U3.23 92.341,88.253 93.218,87.376 v1(95.377,87.376) ; U2.42 96.418,81.305 98.425,83.312 98.425,85.338 R2.1 98.428,85.347 98.428,86.484 98.131,86.781 97.967,86.781 97.528,87.221 v1(97.406,87.221)
  L4(SIGNAL) w0.25: v1(95.377,87.376) 95.885,87.884 96.867,87.884 97.044,87.707 97.044,87.705 97.406,87.343 v1(97.406,87.221)
IMU_SDA: R3.1 U2.43 U3.24 | length 14.1
  L1(SIGNAL) w0.25: U3.24 96.286,88.753 96.895,88.144 R3.1 96.901,85.211 96.901,84.074 96.52,83.693 96.52,82.677 95.918,82.075 U2.43
"LED PWR K": D1.1 R1.2 | length 3.8
  L1(SIGNAL) w0.5: D1.1@111.05,67.25 111.1,67.25 111.75,67.9 113.207,67.9 113.5,68.193 R1.2
"MCU _SWDIO": J2.4 U2.34 | length 26.7
  L1(SIGNAL) w0.25: U2.34 103.17,78.47 104.353,79.653 106.552,79.653 107.6,80.7 107.6,82 108.396,82.796 109.696,82.796 110.235,83.335 110.235,89.917 109.728,90.424 105.283,90.424 104.902,90.043 J2.4
"MCU LED A": D2.2 U2.26 | length 2
  L1(SIGNAL) w0.3: U2.26 99.593,74.495 101.477,74.495 D2.2
"MCU LED K": D2.1 R4.2 | length 1.7
  L1(SIGNAL) w0.3: R4.2 102.393,72.935 102.393,74.511 D2.1
MCU_BOOT0: R7.2 U2.44 | length 2.5
  L1(SIGNAL) w0.25: U2.44 95.418,82.591 R7.2
MCU_NRST: C10.2 J2.1 R5.1 U2.7 | length 33
  L1(SIGNAL) w0.25: v5(89.6,75.9) 89.776,75.9 90.248,76.372 90.472,76.372 90.57,76.47 U2.7 ; v1(102.616,87.503) 102.716,87.503 102.97,87.757 J2.1 ; R5.1 C10.2 105,92.554 v1(105,91.5)
  L4(SIGNAL) w0.25: v5(89.6,75.9) 89.712,76.012 89.712,76.725 90,77.013 90,77.951 89.789,78.162 89.789,80.137 92.964,83.312 96.901,83.312 101.092,87.503 v1(102.616,87.503) 103.502,88.389 103.502,89.502 103.632,89.632 103.632,90.132 v1(105,91.5)
MCU_OSC_IN: R?.2 U2.5 | length 9.9
  L1(SIGNAL) w0.2: R?.2 84.328,77.216 85.09,77.978 88.519,77.978 89.027,77.47 U2.5
MCU_OSC_OUT: R6.1 U2.6 | length 5
  L1(SIGNAL) w0.25: R6.1 88.757,76.073 89.265,76.581 90.043,76.581 90.432,76.97 U2.6
MCU_PA4: J3.2 U2.14 | length 6.6
  L1(SIGNAL) w0.25: J3.2 92.613,70.896 93.918,72.201 U2.14
MCU_PA5: J3.3 U2.15 | length 6.4
  L1(SIGNAL) w0.25: J3.3 93.726,67.436 93.726,70.866 94.418,71.558 U2.15
MCU_PA6: J3.4 U2.16 | length 6.1
  L1(SIGNAL) w0.25: U2.16 94.918,68.044 95.113,67.849 J3.4
MCU_PA47: J3.5 U2.17 | length 6.4
  L1(SIGNAL) w0.25: U2.17 95.418,72.095 95.885,71.628 95.885,70.485 96.393,69.977 96.393,67.329 J3.5
MCU_SWCLK: J2.5 U2.37 | length 12.6
  L1(SIGNAL) w0.25: U2.37 98.918,82.154 100.711,83.947 102.851,83.947 102.997,84.093 102.997,84.709 104.775,86.487 106.026,86.487 106.172,86.633 J2.5
MCU_SWO: J2.6 U2.39 | length 19.5
  L1(SIGNAL) w0.25: U2.39 97.918,82.043 100.775,84.9 101.3,84.9 101.486,84.714 102.014,84.714 v1(102.1,84.8) ; J2.6 106.233,88.966 106.94,88.966 107.642,88.265 108.058,88.265 108.204,88.119 108.204,85.852 107.823,85.852 107.087,85.116 106.916,85.116 v1(106.4,84.6)
  L4(SIGNAL) w0.25: v1(102.1,84.8) 102.222,84.8 103.322,83.7 105.5,83.7 v1(106.4,84.6)
MCU_VCAP1: C9.2 U2.22 | length 1.8
  L1(SIGNAL) w0.25: C9.2 C9.2@97.807,71.772 ; 97.807,72.661 97.918,72.772 U2.22
  L1(SIGNAL) w0.3: C9.2@97.807,71.772 97.807,72.661
NetC11_2: C11.2 R?.1 Y1.1 | length 6.3
  L1(SIGNAL) w0.25: R?.1 85.667,75.369 C11.2 85.725,74.422 85.979,74.168 86.233,74.168 86.487,73.914 86.487,72.565 85.512,71.59 Y1.1@85.262,71.59
USB_D_N: J1.2 U2.32 | length 11.4
  L1(SIGNAL) w0.26: U2.32 109.924,77.47 110.051,77.343 J1.2
USB_D_P: J1.3 U2.33 | length 11.3
  L1(SIGNAL) w0.26: U2.33 110.028,77.97 110.051,77.993 J1.3
VBUS: C4.2 FB1.1 J1.1
XTAL_IN: C12.2 R6.2 Y1.3 | length 3
  L1(SIGNAL) w0.25: R6.2 87.382,73.395 Y1.3
pads on no net: J1.4 J1.6 J1.7 J1.8 J1.9 J1.10 J1.11 J2. J3.7 J3.8 U2.2 U2.3 U2.4 U2.10 U2.11 U2.12 U2.13 U2.18 U2.19 U2.20 U2.21 U2.25 U2.27 U2.28 U2.29 U2.30 U2.31 U2.38 U2.40 U2.41 U2.46 U3.2 U3.3 U3.4 U3.5 U3.6 U3.7 U3.14 U3.15 U3.16 U3.17 U3.19 U3.21 U3.22
copper on no net:
  other v3: 112,93

## Polygon pours and split planes (outlines as drawn)
+3V3 on L1(SIGNAL) "+3V3_L01_P002" (solid, pour order 2): 105.5,70.3 105.3,70.1 105.3,65 104.4,64.1 103.8,64.1 103.2,63.5 103.2,62.8 103.4,62.6 107.9,62.6 108.4,63.1 108.4,63.7 107.7,64.4 107.7,65.7 108.3,66.3 110,66.3 110.6,66.9 110.6,68.4 111.1,68.9 111.1,70.4 111,70.5 109.4,70.5 109.3,70.4 109.3,68.7 106.4,68.7 106.3,68.8 106.3,70.1 106.1,70.3
GND on L1(SIGNAL) "GND_L01_P034" (solid, pour order 34): 109.3,74.4 105.583,74.4 105.5,74.317 105.5,72.8 105.4,72.8 105.1,72.5 105.1,71.2 105.3,71 107.1,71 107.1,69.5 107.6,69 108.7,69 109,69.3 109,70.8 111,70.8 111.3,70.5 111.3,68.8 111.5,68.6 112.9,68.6 113.1,68.8 113.1,69.4 113.2,69.5 113.8,69.5 114,69.7 114,71.1 113.5,71.6 110,71.6 109.5,72.1 109.5,74.2
+5V on L1(SIGNAL) "+5V_L01_P011" (solid, pour order 11): 105.537,74.646 105.683,74.5 107.197,74.5 107.315,74.618 107.315,76.738 107.188,76.865 105.664,76.865 105.537,76.738
+5V on L1(SIGNAL) "+5V_L01_P027" (solid, pour order 27): 105.537,75.692 105.537,75.565 104.5,74.528 104.5,74.2 103.7,73.4 103.499,73.4 102.87,72.771 102.87,69.342 103.251,68.961 104.648,68.961 104.8,69.113 104.8,73.9 105.59,74.69
VBUS on L1(SIGNAL) "VBUS_L01_P006" (solid, pour order 6): 111.76,76.962 107.569,76.962 107.442,76.835 107.442,74.803 107.745,74.5 109.171,74.5 109.347,74.676 109.347,76.327 111.633,76.327 111.76,76.454 111.76,76.581
GND on L2(GND) "GND_L02_P020" (solid, pour order 20): 83,93.8 114,93.8 114,62.3 83,62.3 83,92.8
GND on L3(GND) "GND_L03_P022" (solid, pour order 22): 83,94 114,94 114,62.4 83,62.4 83,93

## Other copper
L1(SIGNAL):

## Silkscreen, mask and mechanical layers (free items; w line width, h text height)
Top Overlay:
  drawing of 29 lines, arcs and shapes, not listed
  text "MPU-6050" at 87.654,91.154 h0.7
  text "SWD" at 99.446,87.554 h0.7 r90
  text "STM32F4" at 100.354,75.854 h0.7
  text "USB" at 111.154,72.254 h1
  text "CYL" at 89.846,71.454 h0.7 r90
  text "DIBYAJYOTI" at 83.054,64.554 h0.6
Mechanical 1:
  lines w0.254: 82.9,91.2 82.9,93.33 cw(c83.978,93.33) 83.978,94.408 113.6,94.5 cw(c113.6,93.5) 114.6,93.5 114.522,64.5 114.522,62.894 cw(c113.623,62.894) 114.259,62.259 cw(c113.151,63.366) 113.151,61.8 112.8,61.8 85,61.8 ; 82.9,91.3 ccw(c82.9,91.299) 82.899,91.299 82.637,63.666 82.637,63.37 82.637,63.07 ccw(c83.907,63.07) 83.907,61.8 85.2,61.8 ; 85.2,61.8 ccw(c85.2,61.8) 85.2,61.8